# Altium PCB MainBoardPCB1.PcbDoc (part 14 of 40)
Units mm, origin at the board's own origin, x right, y up, seen from the top; angles counter-clockwise.
Board outline 258.95 x 308.86 mm, 16 copper layers (L1, L2 (GND), L3 (Sign), L4 (GND), L5 (Sign), L6 (PWR/GND), L7(PWR/GND), L8 (Plane_GND), L9 (PWR/GND), L10 (PWR/GND), L11 (PWR/GND), L12 (Sign), L13 (GND), L14 (Sign), L15 (GND), L16), stack 2.502 mm thick; 2397 components, 1744 nets, 8397 pads, 4112 vias.
Unrouted connection lines stored in the file: 3547.
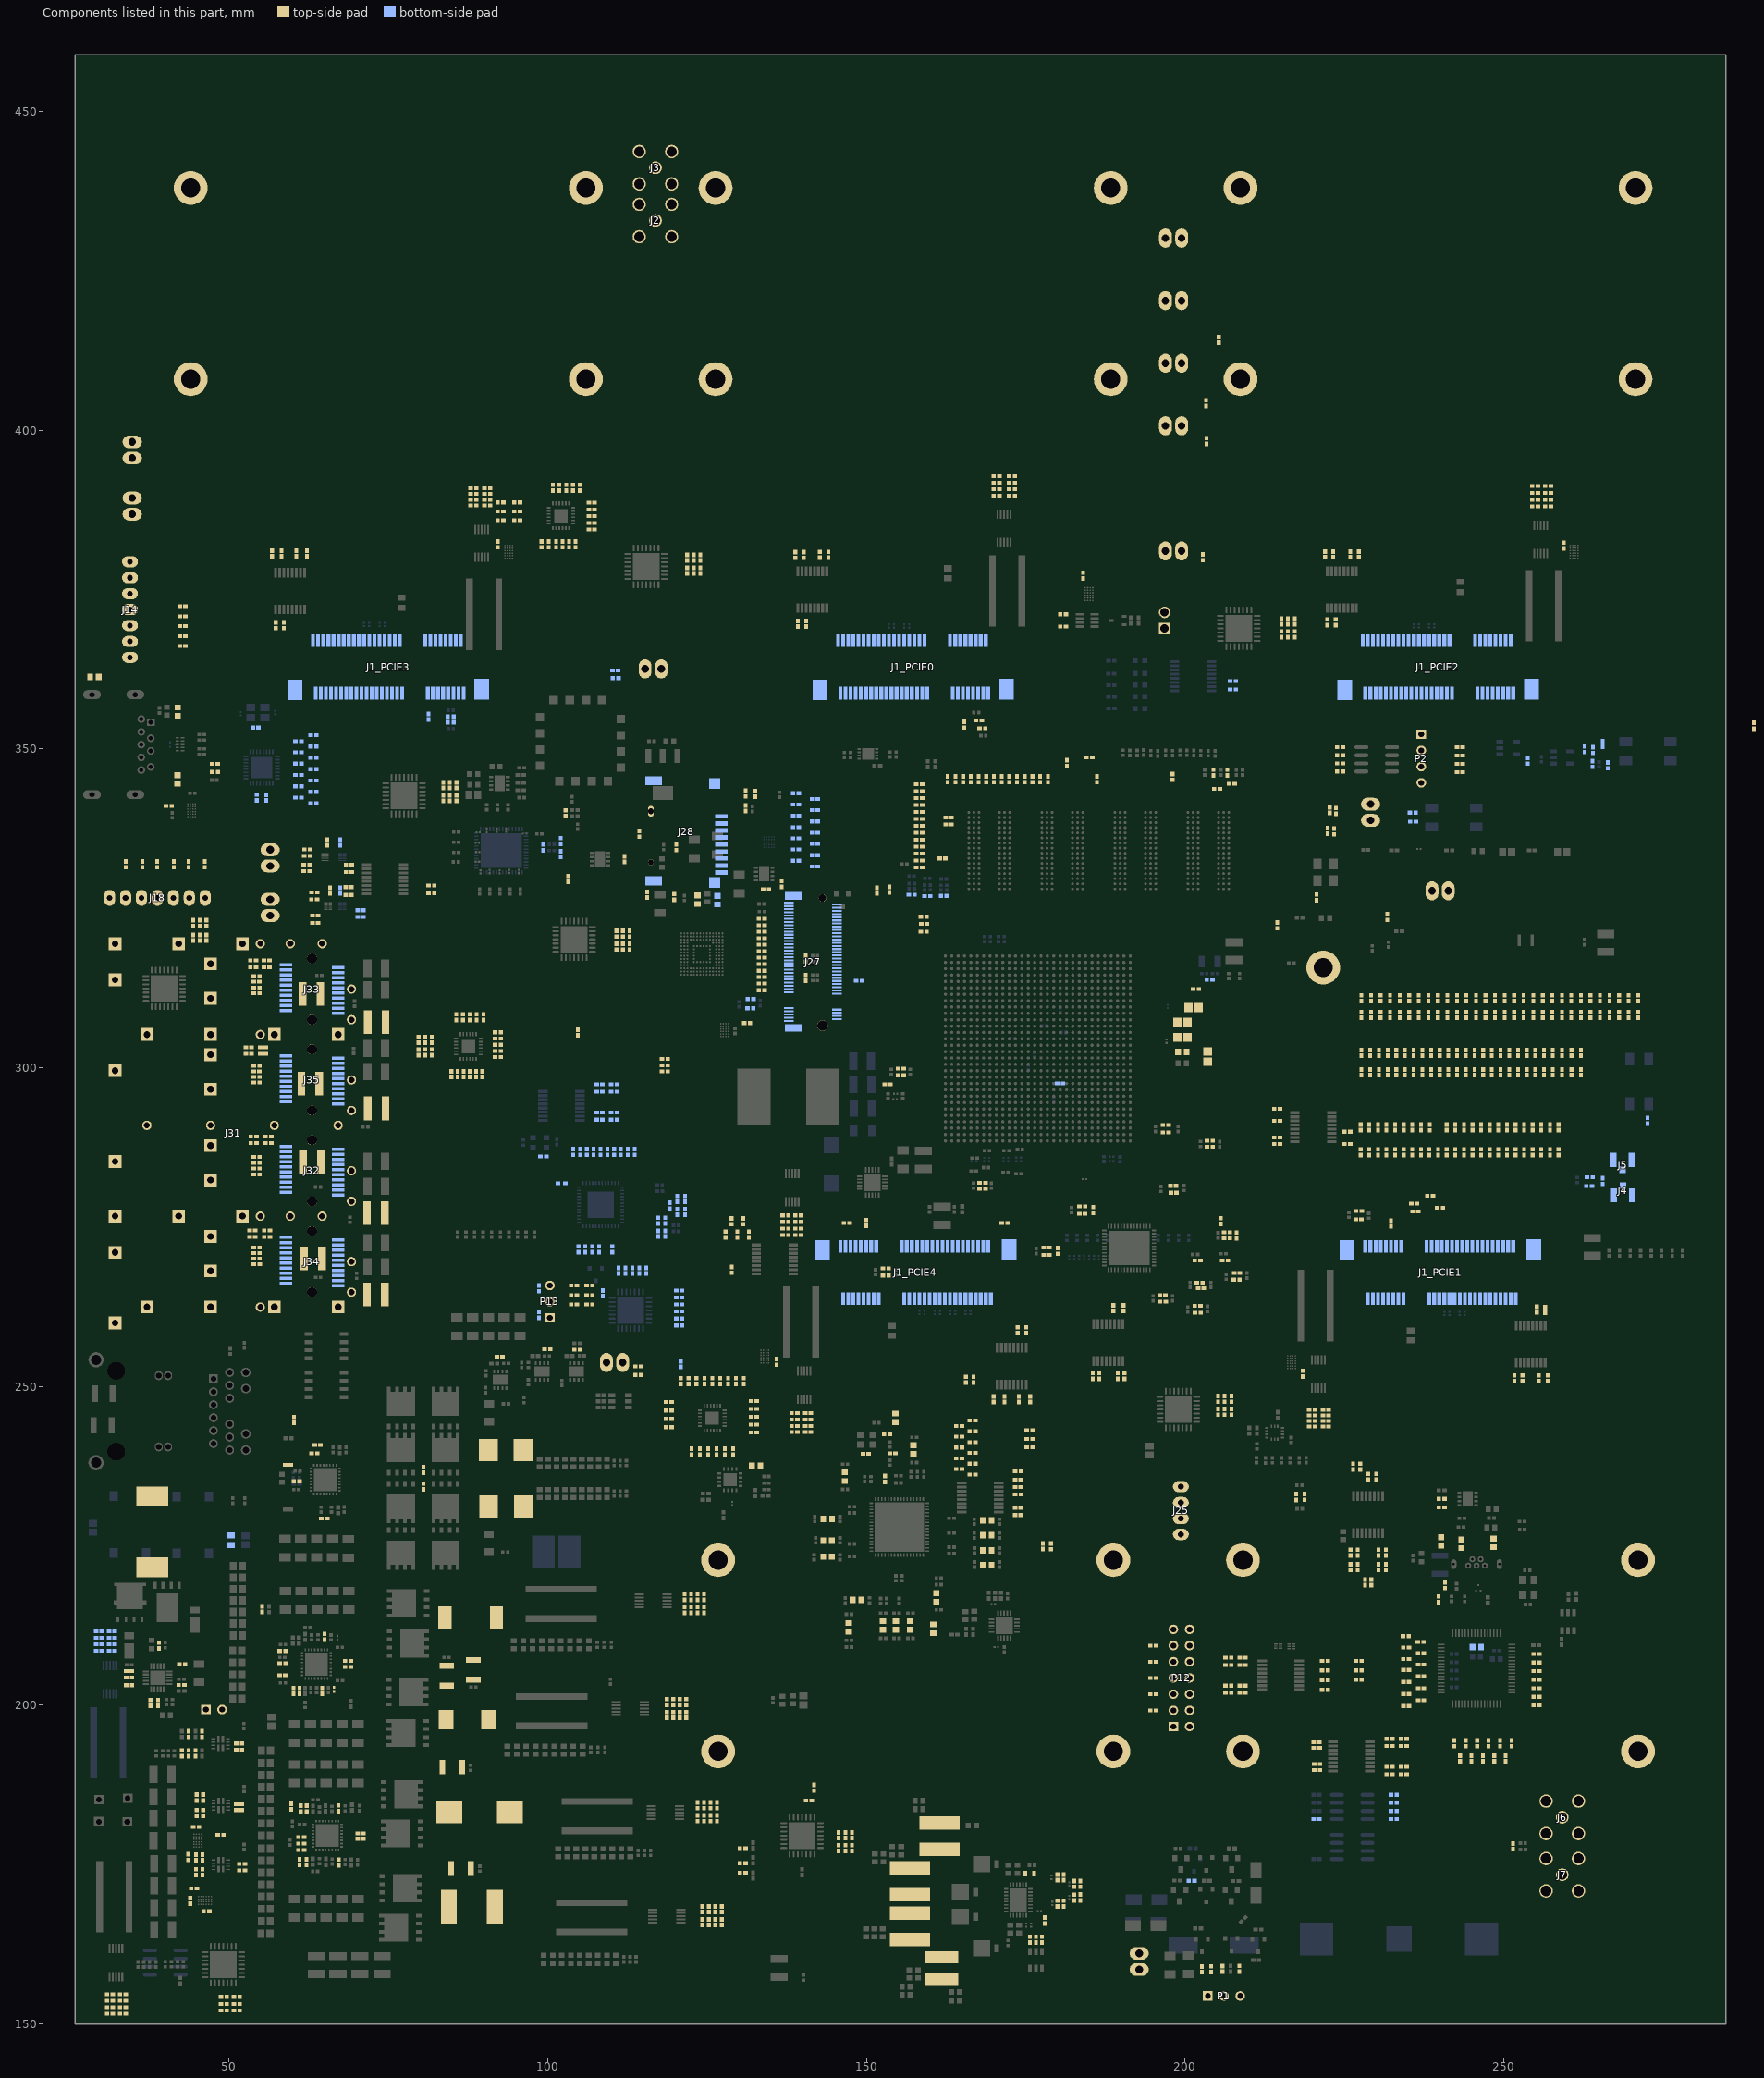
[diagram p20: the components of this part, seen from the top]

## Part data (continued)
R56: library part Resistor, "Resistor;  Thick Film;  Res 499 Ohms;  Pwr-Rtg 0.1 W;  Tol 1%;  SMT;  0402;  Tape & Reel", Case/Package=0402, Case Code (Metric)=1005, Manufacturer=Panasonic, Manufacturer Part Number=ERJ-2RKF4990X, Max Operating Temperature=155°C, Max Power Dissipation=100mW, Min Operating Temperature=-55°C, Package Quantity=1, Supplier Part Number 1=P499LCT-ND, Temperature Coefficient=100ppm/°C, Tolerance=1%, Voltage Rating=50V, Case Code (Imperial)=0402, Category="Chip SMD Resistors", ComponentLink1Description=https://datasheet.ciiva.com/9181/aoa0000ce2-9181461.pdf?src-supplier=Avnet, ComponentLink1URL=https://datasheet.ciiva.com/9181/aoa0000ce2-9181461.pdf?src-supplier=Avnet, ComponentLink2Description=https://datasheet.ciiva.com/28695/1678782-28695781.pdf?src-supplier=Element14, ComponentLink2URL=https://datasheet.ciiva.com/28695/1678782-28695781.pdf?src-supplier=Element14, ComponentLink3Description=https://datasheet.ciiva.com/6201/426256-6201373.pdf?src-supplier=Farnell, ComponentLink3URL=https://datasheet.ciiva.com/6201/426256-6201373.pdf?src-supplier=Farnell, ComponentLink4Description=https://datasheet.ciiva.com/16508/aoa0000ce2-16508382.pdf?src-supplier=Future+Electronics, ComponentLink4URL=https://datasheet.ciiva.com/16508/aoa0000ce2-16508382.pdf?src-supplier=Future+Electronics, ComponentLink5Description=https://datasheet.ciiva.com/16765/70260748-16765054.pdf?src-supplier=Allied+Electronics, ComponentLink5URL=https://datasheet.ciiva.com/16765/70260748-16765054.pdf?src-supplier=Allied+Electronics, ComponentLink6Description=https://datasheet.ciiva.com/22749/1678782-22749610.pdf?src-supplier=Element14, ComponentLink6URL=https://datasheet.ciiva.com/22749/1678782-22749610.pdf?src-supplier=Element14, ComponentLink7Description=https://datasheet.ciiva.com/46377/426256-46377550.pdf?src-supplier=Element14, ComponentLink7URL=https://datasheet.ciiva.com/46377/426256-46377550.pdf?src-supplier=Element14, Composition="Thick Film", Contact Plating=Tin, Depth=0.5mm, Features="Automotive AEC-Q200", Height=0.35mm, Lead Free="Lead Free", Length=1mm, Military Standard=Not, Mount="Surface Mount", Number of Terminations=2, Packaging="Tape and Reel", Power Rating=100mW, Pricing 1="1=0,10000, 10=0,04100, 100=0,01670, 1000=0,00751, 2500=0,00652, 5000=0,00538 (USD)", REACH SVHC="No SVHC", Resistance=499R, RoHS=Yes, Stock 1=4560116, Supplier 1=Digi-Key, Termination=SMD/SMT, Voltage Rating (DC)=50V, Width=0.02inch
R58 R99 R267 R276 R363 R364 R365 R381 R382 R730 R731 R732 R733 R734: library part Resistor, Case/Package=0402, Case Code (Metric)=1005, Manufacturer=Panasonic, Manufacturer Part Number=ERJ-2RKF4701X, Max Operating Temperature=155°C, Max Power Dissipation=100mW, Min Operating Temperature=-55°C, Package Quantity=1, Supplier Part Number 1=P4.70KLCT-ND, Temperature Coefficient=100ppm/°C, Tolerance=1%, Voltage Rating=50V, Case Code (Imperial)=0402, ComponentLink1Description=https://datasheet.ciiva.com/11821/0900766b80f80784-11821329.pdf?src-supplier=RSComponents, ComponentLink1URL=https://datasheet.ciiva.com/11821/0900766b80f80784-11821329.pdf?src-supplier=RSComponents, ComponentLink2Description=https://datasheet.ciiva.com/30053/aoa0000ce2-30053990.pdf?src-supplier=Onlinecomponents.com, ComponentLink2URL=https://datasheet.ciiva.com/30053/aoa0000ce2-30053990.pdf?src-supplier=Onlinecomponents.com, ComponentLink3Description=https://datasheet.ciiva.com/7830/aoa0000ce2-7830727.pdf?src-supplier=Element14, ComponentLink3URL=https://datasheet.ciiva.com/7830/aoa0000ce2-7830727.pdf?src-supplier=Element14, ComponentLink4Description=https://datasheet.ciiva.com/22781/1678782-22781576.pdf?src-supplier=Farnell, ComponentLink4URL=https://datasheet.ciiva.com/22781/1678782-22781576.pdf?src-supplier=Farnell, ComponentLink5Description=https://datasheet.ciiva.com/9195/aoa0000ce2-9195737.pdf?src-supplier=Avnet, ComponentLink5URL=https://datasheet.ciiva.com/9195/aoa0000ce2-9195737.pdf?src-supplier=Avnet, ComponentLink6Description=https://datasheet.ciiva.com/17213/aoa0000ce2-17213180.pdf?src-supplier=Avnet+Europe, ComponentLink6URL=https://datasheet.ciiva.com/17213/aoa0000ce2-17213180.pdf?src-supplier=Avnet+Europe, ComponentLink7Description=https://datasheet.ciiva.com/22667/1678782-22667886.pdf?src-supplier=Element14, ComponentLink7URL=https://datasheet.ciiva.com/22667/1678782-22667886.pdf?src-supplier=Element14, ComponentLink8Description=https://datasheet.ciiva.com/16763/70260748-16763151.pdf?src-supplier=Allied+Electronics, ComponentLink8URL=https://datasheet.ciiva.com/16763/70260748-16763151.pdf?src-supplier=Allied+Electronics, ComponentLink9Description=https://datasheet.ciiva.com/22723/1678782-22723903.pdf?src-supplier=Element14, ComponentLink9URL=https://datasheet.ciiva.com/22723/1678782-22723903.pdf?src-supplier=Element14, ComponentLink10Description=https://datasheet.ciiva.com/24025/aoa0000ce2-24025663.pdf?src-supplier=Mouser, ComponentLink10URL=https://datasheet.ciiva.com/24025/aoa0000ce2-24025663.pdf?src-supplier=Mouser, Composition="Thick Film", Contact Plating=Tin, Depth=0.5mm, Features="Automotive AEC-Q200", Height=0.35mm, Lead Free="Lead Free", Length=1mm, Military Standard=Not, Mount="Surface Mount", Number of Pins=2, Number of Terminations=2, Packaging="Tape and Reel", Power Rating=100mW, Pricing 1="1 = 0,10000, 10 = 0,05500, 100 = 0,02250, 1000 = 0,01009, 2500 = 0,00876, 5000 = 0,00724 (USD)", Radiation Hardening=No, REACH SVHC="No SVHC", Resistance=4.7kR, RoHS=Yes, Stock 1=5361977, Supplier 1=Digi-Key, Termination=SMD/SMT, Voltage Rating (DC)=50V, Width=0.02inch
R61 R62 R63 R64 R920: library part Resistor, Case/Package=0402, Case Code (Metric)=1005, Manufacturer=Vishay, Manufacturer Part Number=CRCW0402240RFKED, Max Operating Temperature=155°C, Max Power Dissipation=63mW, Min Operating Temperature=-55°C, Package Quantity=10, Supplier Part Number 1=541-240LCT-ND, Temperature Coefficient=100ppm/°C, Tolerance=1%, Voltage Rating=50V, Case Code (Imperial)=0402, ComponentLink1Description=https://datasheet.ciiva.com/11809/0900766b80d98824-11809853.pdf?src-supplier=RSComponents, ComponentLink1URL=https://datasheet.ciiva.com/11809/0900766b80d98824-11809853.pdf?src-supplier=RSComponents, ComponentLink2Description=https://datasheet.ciiva.com/16784/70201119-16784686.pdf?src-supplier=Allied+Electronics, ComponentLink2URL=https://datasheet.ciiva.com/16784/70201119-16784686.pdf?src-supplier=Allied+Electronics, ComponentLink3Description=https://datasheet.ciiva.com/16886/dcrcwe3-16886728.pdf?src-supplier=Avnet+Europe, ComponentLink3URL=https://datasheet.ciiva.com/16886/dcrcwe3-16886728.pdf?src-supplier=Avnet+Europe, ComponentLink4Description=https://datasheet.ciiva.com/2463/dcrcwe3-2463067.pdf?src-supplier=Digi-Key, ComponentLink4URL=https://datasheet.ciiva.com/2463/dcrcwe3-2463067.pdf?src-supplier=Digi-Key, ComponentLink5Description=https://datasheet.ciiva.com/2463/dcrcwe3-2463068.pdf?src-supplier=Digi-Key, ComponentLink5URL=https://datasheet.ciiva.com/2463/dcrcwe3-2463068.pdf?src-supplier=Digi-Key, ComponentLink6Description=https://datasheet.ciiva.com/2463/dcrcwe3-2463069.pdf?src-supplier=Digi-Key, ComponentLink6URL=https://datasheet.ciiva.com/2463/dcrcwe3-2463069.pdf?src-supplier=Digi-Key, ComponentLink7Description=https://datasheet.ciiva.com/8954/dcrcwe3-8954621.pdf?src-supplier=Avnet, ComponentLink7URL=https://datasheet.ciiva.com/8954/dcrcwe3-8954621.pdf?src-supplier=Avnet, ComponentLink8Description=https://datasheet.ciiva.com/16204/dcrcwe3-16204941.pdf?src-supplier=Future+Electronics, ComponentLink8URL=https://datasheet.ciiva.com/16204/dcrcwe3-16204941.pdf?src-supplier=Future+Electronics, ComponentLink9Description=https://datasheet.ciiva.com/5546/dcrcwe3-109170-5546510.pdf?src-supplier=Mouser, ComponentLink9URL=https://datasheet.ciiva.com/5546/dcrcwe3-109170-5546510.pdf?src-supplier=Mouser, ComponentLink10Description=https://datasheet.ciiva.com/16780/70201119-16780206.pdf?src-supplier=Allied+Electronics, ComponentLink10URL=https://datasheet.ciiva.com/16780/70201119-16780206.pdf?src-supplier=Allied+Electronics, Composition="Thick Film", Contact Plating=Tin, Depth=0.5mm, Features="Automotive AEC-Q200", Height=0.35mm, Lead Free="Lead Free", Length=1mm, Military Standard=Not, Mount="Surface Mount", Number of Terminations=2, Packaging="Tape and Reel", Power Rating=63mW, Pricing 1="1 = 0,10000, 10 = 0,03800, 100 = 0,01540, 1000 = 0,00690, 2500 = 0,00599, 5000 = 0,00495 (USD)", Radiation Hardening=No, REACH SVHC=Unknown, Resistance=240R, RoHS=Yes, Stock 1=21562, Supplier 1=Digi-Key, Termination=SMD/SMT, Voltage Rating (DC)=50V, Weight=2.3E-05oz, Width=0.02inch, Working Voltage=50V
R65 R66 R67 R68 R83 R84 R85 R86 R97 R98 R123 R135 R136 R137 R138 R145 R146 R147 R148 R155 R156 R157 R158 R346 R347 R348 R349 R350 R351 R352 R353 R354 R355 R356 R357 R367: library part Resistor, Case Code (Imperial)=0402, Case Code (Metric)=1005, Manufacturer=Panasonic, Manufacturer Part Number=ERJ-2RKF4701X, Max Operating Temperature=155°C, Max Power Dissipation=100mW, Min Operating Temperature=-55°C, Package Quantity=1, Supplier Part Number 1=P4.70KLCT-ND, Temperature Coefficient=100ppm/°C, Tolerance=1%, Voltage Rating=50V, Case/Package=0402, ComponentLink1Description=https://datasheet.ciiva.com/11821/0900766b80f80784-11821329.pdf?src-supplier=RSComponents, ComponentLink1URL=https://datasheet.ciiva.com/11821/0900766b80f80784-11821329.pdf?src-supplier=RSComponents, ComponentLink2Description=https://datasheet.ciiva.com/30053/aoa0000ce2-30053990.pdf?src-supplier=Onlinecomponents.com, ComponentLink2URL=https://datasheet.ciiva.com/30053/aoa0000ce2-30053990.pdf?src-supplier=Onlinecomponents.com, ComponentLink3Description=https://datasheet.ciiva.com/7830/aoa0000ce2-7830727.pdf?src-supplier=Element14, ComponentLink3URL=https://datasheet.ciiva.com/7830/aoa0000ce2-7830727.pdf?src-supplier=Element14, ComponentLink4Description=https://datasheet.ciiva.com/22781/1678782-22781576.pdf?src-supplier=Farnell, ComponentLink4URL=https://datasheet.ciiva.com/22781/1678782-22781576.pdf?src-supplier=Farnell, ComponentLink5Description=https://datasheet.ciiva.com/9195/aoa0000ce2-9195737.pdf?src-supplier=Avnet, ComponentLink5URL=https://datasheet.ciiva.com/9195/aoa0000ce2-9195737.pdf?src-supplier=Avnet, ComponentLink6Description=https://datasheet.ciiva.com/17213/aoa0000ce2-17213180.pdf?src-supplier=Avnet+Europe, ComponentLink6URL=https://datasheet.ciiva.com/17213/aoa0000ce2-17213180.pdf?src-supplier=Avnet+Europe, ComponentLink7Description=https://datasheet.ciiva.com/22667/1678782-22667886.pdf?src-supplier=Element14, ComponentLink7URL=https://datasheet.ciiva.com/22667/1678782-22667886.pdf?src-supplier=Element14, ComponentLink8Description=https://datasheet.ciiva.com/16763/70260748-16763151.pdf?src-supplier=Allied+Electronics, ComponentLink8URL=https://datasheet.ciiva.com/16763/70260748-16763151.pdf?src-supplier=Allied+Electronics, ComponentLink9Description=https://datasheet.ciiva.com/22723/1678782-22723903.pdf?src-supplier=Element14, ComponentLink9URL=https://datasheet.ciiva.com/22723/1678782-22723903.pdf?src-supplier=Element14, ComponentLink10Description=https://datasheet.ciiva.com/24025/aoa0000ce2-24025663.pdf?src-supplier=Mouser, ComponentLink10URL=https://datasheet.ciiva.com/24025/aoa0000ce2-24025663.pdf?src-supplier=Mouser, Composition="Thick Film", Contact Plating=Tin, Depth=0.5mm, Features="Automotive AEC-Q200", Height=0.35mm, Lead Free="Lead Free", Length=1mm, Military Standard=Not, Mount="Surface Mount", Number of Pins=2, Number of Terminations=2, Packaging="Tape and Reel", Power Rating=100mW, Pricing 1="1 = 0,10000, 10 = 0,05500, 100 = 0,02250, 1000 = 0,01009, 2500 = 0,00876, 5000 = 0,00724 (USD)", Radiation Hardening=No, REACH SVHC="No SVHC", Resistance=4.7kR, RoHS=Yes, Stock 1=5361977, Supplier 1=Digi-Key, Termination=SMD/SMT, Voltage Rating (DC)=50V, Width=0.02inch
R69 R70 R78 R82 R126 R311 R535 R543 R654 R657: library part Resistor, Case Code (Imperial)=0402, Case Code (Metric)=1005, Manufacturer="Vishay Dale", Manufacturer Part Number=CRCW0402100RFKED, Max Operating Temperature=155°C, Max Power Dissipation=63mW, Min Operating Temperature=-55°C, Package Quantity=10, Supplier Part Number 1=541-100LDKR-ND, Temperature Coefficient=100ppm/°C, Tolerance=1%, Voltage Rating=50V, Case/Package=0402, ComponentLink1Description=https://datasheet.ciiva.com/11809/0900766b80d98824-11809081.pdf?src-supplier=RSComponents, ComponentLink1URL=https://datasheet.ciiva.com/11809/0900766b80d98824-11809081.pdf?src-supplier=RSComponents, ComponentLink2Description=https://datasheet.ciiva.com/2463/dcrcwe3-2463094.pdf?src-supplier=Digi-Key, ComponentLink2URL=https://datasheet.ciiva.com/2463/dcrcwe3-2463094.pdf?src-supplier=Digi-Key, ComponentLink3Description=https://datasheet.ciiva.com/16199/dcrcwe3-16199158.pdf?src-supplier=Future+Electronics, ComponentLink3URL=https://datasheet.ciiva.com/16199/dcrcwe3-16199158.pdf?src-supplier=Future+Electronics, ComponentLink4Description=https://datasheet.ciiva.com/2463/dcrcwe3-2463095.pdf?src-supplier=Digi-Key, ComponentLink4URL=https://datasheet.ciiva.com/2463/dcrcwe3-2463095.pdf?src-supplier=Digi-Key, ComponentLink5Description=https://datasheet.ciiva.com/2463/dcrcwe3-2463096.pdf?src-supplier=Digi-Key, ComponentLink5URL=https://datasheet.ciiva.com/2463/dcrcwe3-2463096.pdf?src-supplier=Digi-Key, ComponentLink6Description=https://datasheet.ciiva.com/5552/dcrcwe3-109170-5552168.pdf?src-supplier=Mouser, ComponentLink6URL=https://datasheet.ciiva.com/5552/dcrcwe3-109170-5552168.pdf?src-supplier=Mouser, ComponentLink7Description=https://datasheet.ciiva.com/8083/dcrcwe3-8083977.pdf?src-supplier=Avnet, ComponentLink7URL=https://datasheet.ciiva.com/8083/dcrcwe3-8083977.pdf?src-supplier=Avnet, ComponentLink8Description=https://datasheet.ciiva.com/16722/70201119-16722524.pdf?src-supplier=Allied+Electronics, ComponentLink8URL=https://datasheet.ciiva.com/16722/70201119-16722524.pdf?src-supplier=Allied+Electronics, ComponentLink9Description=https://datasheet.ciiva.com/22673/1697337-22673117.pdf?src-supplier=Element14, ComponentLink9URL=https://datasheet.ciiva.com/22673/1697337-22673117.pdf?src-supplier=Element14, ComponentLink10Description=https://datasheet.ciiva.com/22673/1697337-22673118.pdf?src-supplier=Element14, ComponentLink10URL=https://datasheet.ciiva.com/22673/1697337-22673118.pdf?src-supplier=Element14, ComponentLink11Description=https://datasheet.ciiva.com/3255/dcrcwe3-3255951.pdf?src-supplier=Avnet, ComponentLink11URL=https://datasheet.ciiva.com/3255/dcrcwe3-3255951.pdf?src-supplier=Avnet, Composition="Thick Film", Contact Plating=Tin, Depth=0.5mm, Features="Automotive AEC-Q200", Height=0.35mm, Lead Free="Lead Free", Length=1mm, Military Standard=Not, Mount="Surface Mount", Number of Terminations=2, Packaging="Tape and Reel", Power Rating=63mW, Pricing 1="1 = 0,10000, 10 = 0,03600, 100 = 0,01460, 1000 = 0,00657, 2500 = 0,00570, 5000 = 0,00471 (USD)", Radiation Hardening=No, REACH SVHC=Unknown, Resistance=100R, RoHS=Yes, Stock 1=93648, Supplier 1=Digi-Key, Termination=SMD/SMT, Voltage Rating (DC)=50V, Weight=2.3E-05oz, Width=0.02inch, Working Voltage=50V
R76 R79: library part Resistor, "RES SMD 150 OHM 1% 1/10W 0402", Case/Package=0402, Case Code (Metric)=1005, Manufacturer=Panasonic, Manufacturer Part Number=ERJ-2RKF1500X, Max Operating Temperature=155°C, Max Power Dissipation=100mW, Min Operating Temperature=-55°C, Package Quantity=1, Supplier Part Number 1=P150LCT-ND, Temperature Coefficient=100ppm/°C, Tolerance=1%, Voltage Rating=50V, Case Code (Imperial)=0402, Category="Chip SMD Resistors", ComponentLink1Description=https://datasheet.ciiva.com/34303/1987126-34303555.pdf?src-supplier=Jameco, ComponentLink1URL=https://datasheet.ciiva.com/34303/1987126-34303555.pdf?src-supplier=Jameco, ComponentLink2Description=https://datasheet.ciiva.com/11821/0900766b80f80784-11821183.pdf?src-supplier=RSComponents, ComponentLink2URL=https://datasheet.ciiva.com/11821/0900766b80f80784-11821183.pdf?src-supplier=RSComponents, ComponentLink3Description=https://datasheet.ciiva.com/16774/70260748-16774549.pdf?src-supplier=Allied+Electronics, ComponentLink3URL=https://datasheet.ciiva.com/16774/70260748-16774549.pdf?src-supplier=Allied+Electronics, ComponentLink4Description=https://datasheet.ciiva.com/43467/1678782-43467237.pdf?src-supplier=Farnell, ComponentLink4URL=https://datasheet.ciiva.com/43467/1678782-43467237.pdf?src-supplier=Farnell, ComponentLink5Description=https://datasheet.ciiva.com/7887/426256-7887016.pdf?src-supplier=Element14, ComponentLink5URL=https://datasheet.ciiva.com/7887/426256-7887016.pdf?src-supplier=Element14, ComponentLink6Description=https://datasheet.ciiva.com/16371/aoa0000ce2-16371497.pdf?src-supplier=Future+Electronics, ComponentLink6URL=https://datasheet.ciiva.com/16371/aoa0000ce2-16371497.pdf?src-supplier=Future+Electronics, ComponentLink7Description=https://datasheet.ciiva.com/7886/aoa0000ce2-7886714.pdf?src-supplier=Element14, ComponentLink7URL=https://datasheet.ciiva.com/7886/aoa0000ce2-7886714.pdf?src-supplier=Element14, ComponentLink8Description=https://datasheet.ciiva.com/46373/1678782-46373162.pdf?src-supplier=Element14, ComponentLink8URL=https://datasheet.ciiva.com/46373/1678782-46373162.pdf?src-supplier=Element14, ComponentLink9Description=https://datasheet.ciiva.com/46373/1678782-46373163.pdf?src-supplier=Element14, ComponentLink9URL=https://datasheet.ciiva.com/46373/1678782-46373163.pdf?src-supplier=Element14, ComponentLink10Description=https://datasheet.ciiva.com/16770/70260748-16770572.pdf?src-supplier=Allied+Electronics, ComponentLink10URL=https://datasheet.ciiva.com/16770/70260748-16770572.pdf?src-supplier=Allied+Electronics, ComponentLink11Description=https://datasheet.ciiva.com/17207/aoa0000ce2-17207389.pdf?src-supplier=Avnet+Europe, ComponentLink11URL=https://datasheet.ciiva.com/17207/aoa0000ce2-17207389.pdf?src-supplier=Avnet+Europe, ComponentLink12Description=https://datasheet.ciiva.com/28568/1678782-28568846.pdf?src-supplier=Element14, ComponentLink12URL=https://datasheet.ciiva.com/28568/1678782-28568846.pdf?src-supplier=Element14, ComponentLink13Description=https://datasheet.ciiva.com/30106/aoa0000ce2-30106926.pdf?src-supplier=Onlinecomponents.com, ComponentLink13URL=https://datasheet.ciiva.com/30106/aoa0000ce2-30106926.pdf?src-supplier=Onlinecomponents.com, ComponentLink14Description=https://datasheet.ciiva.com/22673/1678782-22673679.pdf?src-supplier=Element14, ComponentLink14URL=https://datasheet.ciiva.com/22673/1678782-22673679.pdf?src-supplier=Element14, Composition="Thick Film", Contact Plating=Tin, Depth=0.5mm, Features="Automotive AEC-Q200", Height=0.35mm, Lead Free="Lead Free", Length=1mm, Military Standard=Not, Mount="Surface Mount", Number of Pins=2, Number of Terminations=2, Packaging="Tape and Reel", Power Rating=100mW, Pricing 1="1=0,10000, 10=0,04100, 100=0,01670, 1000=0,00751, 2500=0,00652, 5000=0,00538 (USD)", Radiation Hardening=No, REACH SVHC="No SVHC", Resistance=150R, RoHS=Yes, Stock 1=1074892, Supplier 1=Digi-Key, Termination=SMD/SMT, Voltage Rating (DC)=50V, Width=0.02inch
R77: library part Resistor, "RES SMD 7.5K OHM 0.5% 1/16W 0402", Case Code (Imperial)=0402, Case Code (Metric)=1005, Manufacturer=Susumu, Manufacturer Part Number=RR0510P-752-D, Max Operating Temperature=125°C, Max Power Dissipation=63mW, Min Operating Temperature=-55°C, Package Quantity=1, Power Rating=62.5mW, Supplier Part Number 1=RR05P7.5KDCT-ND, Temperature Coefficient=25ppm/°C, Tolerance=0.5%, Voltage Rating=25V, Voltage Rating (DC)=50V, Case/Package=0402, Category="Chip SMD Resistors", ComponentLink1Description=https://datasheet.ciiva.com/2525/rr-data-sheet-2525152.pdf?src-supplier=Digi-Key, ComponentLink1URL=https://datasheet.ciiva.com/2525/rr-data-sheet-2525152.pdf?src-supplier=Digi-Key, ComponentLink2Description=https://datasheet.ciiva.com/2525/rr-data-sheet-2525153.pdf?src-supplier=Digi-Key, ComponentLink2URL=https://datasheet.ciiva.com/2525/rr-data-sheet-2525153.pdf?src-supplier=Digi-Key, ComponentLink3Description=https://datasheet.ciiva.com/2525/rr-data-sheet-2525154.pdf?src-supplier=Digi-Key, ComponentLink3URL=https://datasheet.ciiva.com/2525/rr-data-sheet-2525154.pdf?src-supplier=Digi-Key, Composition="Thin Film", Height=0.016inch, Lead Free="Lead Free", Length=0.039inch, Number of Terminations=2, Packaging="Tape and Reel", Pricing 1="1=0,10000, 10=0,07400, 100=0,02850, 1000=0,01254, 2500=0,01083, 5000=0,00969 (USD)", Resistance=7.5kR, RoHS=Yes, Stock 1=33319, Supplier 1=Digi-Key, Termination=SMD/SMT, Width=0.02inch
R80 R534: library part Resistor, "Res Thick Film 0402 160 Ohm 1% 1/16W 100ppm/C Molded SMD SMD Paper T/R", Case/Package=0402, Manufacturer="Stackpole Electronics", Manufacturer Part Number=RMCF0402FT160R, Max Operating Temperature=155°C, Min Operating Temperature=-55°C, Supplier Part Number 1=RMCF0402FT160RCT-ND, Temperature Coefficient=100ppm/°C, Tolerance=1%, Category="Chip SMD Resistors", ComponentLink1Description=https://www.seielect.com/catalog/SEI-RMCF_RMCP.pdf?src-supplier=Avnet, ComponentLink1URL=https://www.seielect.com/catalog/SEI-RMCF_RMCP.pdf?src-supplier=Avnet, Composition="Thick Film", Contact Plating=Tin,Matte, Mount="Surface Mount", Packaging="Tape and Reel", Pricing 1="1=0,10000, 10=0,01400, 100=0,00580, 1000=0,00262, 2500=0,00228, 5000=0,00188 (USD)", Radiation Hardening=No, Resistance=160R, RoHS=Yes, Stock 1=34661, Supplier 1=Digi-Key
R81 R245 R270 R305 R308 R309 R489 R536 R541 R542: library part Resistor, Case/Package=0402, Case Code (Metric)=1005, Manufacturer="Vishay Dale", Manufacturer Part Number=CRCW0402100RFKED, Max Operating Temperature=155°C, Max Power Dissipation=63mW, Min Operating Temperature=-55°C, Package Quantity=10, Supplier Part Number 1=541-100LDKR-ND, Temperature Coefficient=100ppm/°C, Tolerance=1%, Voltage Rating=50V, Case Code (Imperial)=0402, ComponentLink1Description=https://datasheet.ciiva.com/11809/0900766b80d98824-11809081.pdf?src-supplier=RSComponents, ComponentLink1URL=https://datasheet.ciiva.com/11809/0900766b80d98824-11809081.pdf?src-supplier=RSComponents, ComponentLink2Description=https://datasheet.ciiva.com/2463/dcrcwe3-2463094.pdf?src-supplier=Digi-Key, ComponentLink2URL=https://datasheet.ciiva.com/2463/dcrcwe3-2463094.pdf?src-supplier=Digi-Key, ComponentLink3Description=https://datasheet.ciiva.com/16199/dcrcwe3-16199158.pdf?src-supplier=Future+Electronics, ComponentLink3URL=https://datasheet.ciiva.com/16199/dcrcwe3-16199158.pdf?src-supplier=Future+Electronics, ComponentLink4Description=https://datasheet.ciiva.com/2463/dcrcwe3-2463095.pdf?src-supplier=Digi-Key, ComponentLink4URL=https://datasheet.ciiva.com/2463/dcrcwe3-2463095.pdf?src-supplier=Digi-Key, ComponentLink5Description=https://datasheet.ciiva.com/2463/dcrcwe3-2463096.pdf?src-supplier=Digi-Key, ComponentLink5URL=https://datasheet.ciiva.com/2463/dcrcwe3-2463096.pdf?src-supplier=Digi-Key, ComponentLink6Description=https://datasheet.ciiva.com/5552/dcrcwe3-109170-5552168.pdf?src-supplier=Mouser, ComponentLink6URL=https://datasheet.ciiva.com/5552/dcrcwe3-109170-5552168.pdf?src-supplier=Mouser, ComponentLink7Description=https://datasheet.ciiva.com/8083/dcrcwe3-8083977.pdf?src-supplier=Avnet, ComponentLink7URL=https://datasheet.ciiva.com/8083/dcrcwe3-8083977.pdf?src-supplier=Avnet, ComponentLink8Description=https://datasheet.ciiva.com/16722/70201119-16722524.pdf?src-supplier=Allied+Electronics, ComponentLink8URL=https://datasheet.ciiva.com/16722/70201119-16722524.pdf?src-supplier=Allied+Electronics, ComponentLink9Description=https://datasheet.ciiva.com/22673/1697337-22673117.pdf?src-supplier=Element14, ComponentLink9URL=https://datasheet.ciiva.com/22673/1697337-22673117.pdf?src-supplier=Element14, ComponentLink10Description=https://datasheet.ciiva.com/22673/1697337-22673118.pdf?src-supplier=Element14, ComponentLink10URL=https://datasheet.ciiva.com/22673/1697337-22673118.pdf?src-supplier=Element14, ComponentLink11Description=https://datasheet.ciiva.com/3255/dcrcwe3-3255951.pdf?src-supplier=Avnet, ComponentLink11URL=https://datasheet.ciiva.com/3255/dcrcwe3-3255951.pdf?src-supplier=Avnet, Composition="Thick Film", Contact Plating=Tin, Depth=0.5mm, Features="Automotive AEC-Q200", Height=0.35mm, Lead Free="Lead Free", Length=1mm, Military Standard=Not, Mount="Surface Mount", Number of Terminations=2, Packaging="Tape and Reel", Power Rating=63mW, Pricing 1="1 = 0,10000, 10 = 0,03600, 100 = 0,01460, 1000 = 0,00657, 2500 = 0,00570, 5000 = 0,00471 (USD)", Radiation Hardening=No, REACH SVHC=Unknown, Resistance=100R, RoHS=Yes, Stock 1=93648, Supplier 1=Digi-Key, Termination=SMD/SMT, Voltage Rating (DC)=50V, Weight=2.3E-05oz, Width=0.02inch, Working Voltage=50V
R87 R88 R89 R90 R95 R96 R101 R102 R103 R104 R105 R107 R108 R110 R111 R112 R115 R116 R117 R118 R119 R120 R121 R122: library part Resistor, "RES SMD 30 OHM 0.5% 1/16W 0402", Case Code (Imperial)=0402, Case Code (Metric)=1005, Manufacturer=Panasonic, Manufacturer Part Number=ERA-2AKD300X, Max Operating Temperature=155°C, Max Power Dissipation=63mW, Min Operating Temperature=-55°C, Package Quantity=10000, Power Rating=62.5mW, Supplier Part Number 1=P30DDCT-ND, Temperature Coefficient=100ppm/°C, Tolerance=0.5%, Case/Package=0402, Category="Chip SMD Resistors", ComponentLink1Description=https://media.digikey.com/pdf/Data%20Sheets/Panasonic%20Resistors%20Thermistors%20PDFs/ERA_Series_LE.pdf?src-supplier=Digi-Key, ComponentLink1URL=https://media.digikey.com/pdf/Data%20Sheets/Panasonic%20Resistors%20Thermistors%20PDFs/ERA_Series_LE.pdf?src-supplier=Digi-Key, ComponentLink2Description=http://www.mouser.com/ds/2/315/AOA0000CE26-32660.pdf?src-supplier=Mouser, ComponentLink2URL=http://www.mouser.com/ds/2/315/AOA0000CE26-32660.pdf?src-supplier=Mouser, ComponentLink3Description=http://industrial.panasonic.com/www-data/pdf/AOA0000/AOA0000CE26.pdf?src-supplier=Avnet, ComponentLink3URL=http://industrial.panasonic.com/www-data/pdf/AOA0000/AOA0000CE26.pdf?src-supplier=Avnet, ComponentLink4Description=https://industrial.panasonic.com/cdbs/www-data/pdf/RDM0000/AOA0000C307.pdf?src-supplier=Digi-Key, ComponentLink4URL=https://industrial.panasonic.com/cdbs/www-data/pdf/RDM0000/AOA0000C307.pdf?src-supplier=Digi-Key, Composition="Thin Film", Contact Plating=Tin, Height=0.016inch, Lead Free="Lead Free", Length=0.039inch, Mount="Surface Mount", Number of Terminations=2, Packaging="Tape and Reel", Pricing 1="1=0,10000, 10=0,07500, 100=0,03070, 1000=0,01377, 2500=0,01196, 5000=0,00988 (USD)", Resistance=30R, RoHS=Yes, Stock 1=32301, Supplier 1=Digi-Key, Width=0.02inch
R113: library part Resistor, "Thick Film Resistors 34.8K OHM 1%", Case Code (Imperial)=0402, Case Code (Metric)=1005, Manufacturer=Yageo, Manufacturer Part Number=RC0402FR-0734K8L, Max Operating Temperature=155°C, Max Power Dissipation=63mW, Min Operating Temperature=-55°C, Power Rating=62.5mW, Supplier Part Number 1=YAG3125CT-ND, Temperature Coefficient=100ppm/°C, Tolerance=1%, Voltage Rating=50V, Case/Package=0402, Category="Chip SMD Resistors", ComponentLink1Description=https://datasheet.ciiva.com/16857/pyu-rc0402-51-rohs-l-6-16857399.pdf?src-supplier=Avnet+Europe, ComponentLink1URL=https://datasheet.ciiva.com/16857/pyu-rc0402-51-rohs-l-6-16857399.pdf?src-supplier=Avnet+Europe, ComponentLink2Description=https://datasheet.ciiva.com/26830/getdatasheetpartid-323739-26830055.pdf?src-supplier=Verical, ComponentLink2URL=https://datasheet.ciiva.com/26830/getdatasheetpartid-323739-26830055.pdf?src-supplier=Verical, ComponentLink3Description=https://datasheet.ciiva.com/12656/pyu-rc0402-51-rohs-l-6-r-12656904.pdf?src-supplier=Mouser, ComponentLink3URL=https://datasheet.ciiva.com/12656/pyu-rc0402-51-rohs-l-6-r-12656904.pdf?src-supplier=Mouser, ComponentLink4Description=https://datasheet.ciiva.com/28400/pyu-rc0402-51-rohs-l-6-28400889.pdf?src-supplier=Avnet+Europe, ComponentLink4URL=https://datasheet.ciiva.com/28400/pyu-rc0402-51-rohs-l-6-28400889.pdf?src-supplier=Avnet+Europe, ComponentLink5Description=https://datasheet.ciiva.com/8889/pyu-rc0402-51-rohs-l-6-8889501.pdf?src-supplier=Avnet, ComponentLink5URL=https://datasheet.ciiva.com/8889/pyu-rc0402-51-rohs-l-6-8889501.pdf?src-supplier=Avnet, Composition="Thick Film", Contact Plating=Tin,Matte, Depth=0.5mm, Features="Moisture Resistant", Height=0.016inch, Lead Free="Lead Free", Length=1mm, Military Standard=Not, Number of Terminations=2, Packaging="Tape and Reel", Pricing 1="1=0,10000, 10=0,01600, 100=0,00640, 1000=0,00289, 2500=0,00251, 5000=0,00207 (USD)", Resistance=34.8kR, RoHS=Yes, Stock 1=121134, Supplier 1=Digi-Key, Termination=SMD/SMT, Voltage Rating (DC)=50V, Width=0.02inch
R114 R274 R515 R522 R523 R531 R546 R548 R549 R551 R552 R554 R555 R557: library part Resistor, Case Code (Imperial)=0402, Case Code (Metric)=1005, Manufacturer 1=Yageo, Manufacturer Part Number 1=RC0402FR-0710KL, Max Operating Temperature=155°C, Min Operating Temperature=-55°C, Power Rating=62.5mW, Supplier Part Number 1=311-10.0KLRCT-ND, Temperature Coefficient=100ppm/°C, Tolerance=1%, Voltage Rating=50V, Case/Package=0402, ComponentLink1Description=https://datasheet.ciiva.com/7660/38568-7660787.pdf?src-supplier=Element14, ComponentLink1URL=https://datasheet.ciiva.com/7660/38568-7660787.pdf?src-supplier=Element14, ComponentLink2Description=https://datasheet.ciiva.com/7849/1784430-7849813.pdf?src-supplier=Element14, ComponentLink2URL=https://datasheet.ciiva.com/7849/1784430-7849813.pdf?src-supplier=Element14, ComponentLink3Description=https://datasheet.ciiva.com/7849/1686128-7849814.pdf?src-supplier=Element14, ComponentLink3URL=https://datasheet.ciiva.com/7849/1686128-7849814.pdf?src-supplier=Element14, ComponentLink4Description=https://datasheet.ciiva.com/7849/1784430-7849815.pdf?src-supplier=Element14, ComponentLink4URL=https://datasheet.ciiva.com/7849/1784430-7849815.pdf?src-supplier=Element14, ComponentLink5Description=https://datasheet.ciiva.com/22747/1018594-22747512.pdf?src-supplier=Element14, ComponentLink5URL=https://datasheet.ciiva.com/22747/1018594-22747512.pdf?src-supplier=Element14, ComponentLink6Description=https://datasheet.ciiva.com/12667/pyu-rc0402-51-rohs-l-6-r-12667067.pdf?src-supplier=Mouser, ComponentLink6URL=https://datasheet.ciiva.com/12667/pyu-rc0402-51-rohs-l-6-r-12667067.pdf?src-supplier=Mouser, ComponentLink7Description=https://datasheet.ciiva.com/7983/1018594-7983486.pdf?src-supplier=Element14, ComponentLink7URL=https://datasheet.ciiva.com/7983/1018594-7983486.pdf?src-supplier=Element14, Composition="Thick Film", Depth=0.5mm, Height=0.32mm, Lead Free="Lead Free", Lead Pitch=0.2mm, Length=1mm, Military Standard=Not, Number of Pins=2, Number of Terminations=2, Packaging="Tape and Reel", Pricing 1="1=0,10000, 10=0,01500, 100=0,00600, 1000=0,00270, 2500=0,00235, 5000=0,00194 (USD)", REACH SVHC="No SVHC", Resistance=10kR, RoHS=Yes, Stock 1=71214322, Supplier 1=Digi-Key, Termination=SMD/SMT, Voltage Rating (DC)=50V, Width=0.5mm, Working Voltage=50V
R127 R128 R129 R366: library part Resistor, "SMT Resistor", Case/Package=0402, Case Code (Metric)=1005, Manufacturer=Panasonic, Manufacturer Part Number=ERJ-2RKF1002X, Max Operating Temperature=155°C, Max Power Dissipation=100mW, Min Operating Temperature=-55°C, Package Quantity=1, Supplier Part Number 1=P10.0KLCT-ND, Temperature Coefficient=100ppm/°C, Tolerance=1%, Voltage Rating=50V, Case Code (Imperial)=0402, ComponentLink1Description=https://datasheet.ciiva.com/11821/0900766b80f80784-11821171.pdf?src-supplier=RSComponents, ComponentLink1URL=https://datasheet.ciiva.com/11821/0900766b80f80784-11821171.pdf?src-supplier=RSComponents, ComponentLink2Description=https://datasheet.ciiva.com/16199/aoa0000ce2-16199478.pdf?src-supplier=Future+Electronics, ComponentLink2URL=https://datasheet.ciiva.com/16199/aoa0000ce2-16199478.pdf?src-supplier=Future+Electronics, ComponentLink3Description=https://datasheet.ciiva.com/17212/aoa0000ce2-17212102.pdf?src-supplier=Avnet+Europe, ComponentLink3URL=https://datasheet.ciiva.com/17212/aoa0000ce2-17212102.pdf?src-supplier=Avnet+Europe, ComponentLink4Description=https://datasheet.ciiva.com/43467/1678782-43467402.pdf?src-supplier=Farnell, ComponentLink4URL=https://datasheet.ciiva.com/43467/1678782-43467402.pdf?src-supplier=Farnell, ComponentLink5Description=https://datasheet.ciiva.com/9194/aoa0000ce2-9194142.pdf?src-supplier=Avnet, ComponentLink5URL=https://datasheet.ciiva.com/9194/aoa0000ce2-9194142.pdf?src-supplier=Avnet, ComponentLink6Description=https://datasheet.ciiva.com/16786/70260748-16786734.pdf?src-supplier=Allied+Electronics, ComponentLink6URL=https://datasheet.ciiva.com/16786/70260748-16786734.pdf?src-supplier=Allied+Electronics, ComponentLink7Description=https://datasheet.ciiva.com/24023/aoa0000ce2-24023017.pdf?src-supplier=Mouser, ComponentLink7URL=https://datasheet.ciiva.com/24023/aoa0000ce2-24023017.pdf?src-supplier=Mouser, ComponentLink8Description=https://datasheet.ciiva.com/28514/1678782-28514185.pdf?src-supplier=Element14, ComponentLink8URL=https://datasheet.ciiva.com/28514/1678782-28514185.pdf?src-supplier=Element14, ComponentLink9Description=https://datasheet.ciiva.com/27055/1987020-27055643.pdf?src-supplier=Jameco, ComponentLink9URL=https://datasheet.ciiva.com/27055/1987020-27055643.pdf?src-supplier=Jameco, ComponentLink10Description=https://datasheet.ciiva.com/48531/aoa0000ce2-48531069.pdf?src-supplier=Avnet, ComponentLink10URL=https://datasheet.ciiva.com/48531/aoa0000ce2-48531069.pdf?src-supplier=Avnet, ComponentLink11Description=https://datasheet.ciiva.com/16782/70260748-16782590.pdf?src-supplier=Allied+Electronics, ComponentLink11URL=https://datasheet.ciiva.com/16782/70260748-16782590.pdf?src-supplier=Allied+Electronics, ComponentLink12Description=https://datasheet.ciiva.com/30201/aoa0000ce2-30201022.pdf?src-supplier=Onlinecomponents.com, ComponentLink12URL=https://datasheet.ciiva.com/30201/aoa0000ce2-30201022.pdf?src-supplier=Onlinecomponents.com, Composition="Thick Film", Contact Plating=Tin, Depth=0.5mm, Features="Automotive AEC-Q200", Height=0.35mm, Lead Free="Lead Free", Length=1mm, Military Standard=Not, Mount="Surface Mount", Number of Pins=2, Number of Terminations=2, Packaging="Tape and Reel", Power Rating=100mW, Pricing 1="1 = 0,10000, 10 = 0,04300, 100 = 0,01750, 1000 = 0,00787, 2500 = 0,00683, 5000 = 0,00564 (USD)", Radiation Hardening=No, REACH SVHC="No SVHC", Resistance=10kR, RoHS=Yes, Stock 1=7512515, Supplier 1=Digi-Key, Termination=SMD/SMT, Voltage Rating (DC)=50V, Width=0.02inch
R140: library part Resistor, "RES SMD 2.2 OHM 5% 1/16W 0402", Case Code (Imperial)=0402, Case Code (Metric)=1005, Manufacturer=Yageo, Manufacturer Part Number=RC0402JR-072R2L, Max Operating Temperature=155°C, Max Power Dissipation=63mW, Min Operating Temperature=-55°C, Package Quantity=1, Power Rating=62.5mW, Supplier Part Number 1=311-2.2JRCT-ND, Temperature Coefficient=200ppm/°C, Tolerance=5%, Voltage Rating=50V, Case/Package=0402, Category="Chip SMD Resistors", ComponentLink1Description=https://datasheet.ciiva.com/2452/pyu-r-int-thick-7-2452737.pdf?src-supplier=Digi-Key, ComponentLink1URL=https://datasheet.ciiva.com/2452/pyu-r-int-thick-7-2452737.pdf?src-supplier=Digi-Key, ComponentLink2Description=https://datasheet.ciiva.com/2452/pyu-r-int-thick-7-2452738.pdf?src-supplier=Digi-Key, ComponentLink2URL=https://datasheet.ciiva.com/2452/pyu-r-int-thick-7-2452738.pdf?src-supplier=Digi-Key, ComponentLink3Description=https://datasheet.ciiva.com/2452/pyu-r-int-thick-7-2452739.pdf?src-supplier=Digi-Key, ComponentLink3URL=https://datasheet.ciiva.com/2452/pyu-r-int-thick-7-2452739.pdf?src-supplier=Digi-Key, ComponentLink4Description=https://datasheet.ciiva.com/28639/1018594-28639893.pdf?src-supplier=Element14, ComponentLink4URL=https://datasheet.ciiva.com/28639/1018594-28639893.pdf?src-supplier=Element14, ComponentLink5Description=https://datasheet.ciiva.com/28415/pyu-rc0402-51-rohs-l-6-28415222.pdf?src-supplier=Avnet+Europe, ComponentLink5URL=https://datasheet.ciiva.com/28415/pyu-rc0402-51-rohs-l-6-28415222.pdf?src-supplier=Avnet+Europe, ComponentLink6Description=https://datasheet.ciiva.com/16863/pyu-rc0402-51-rohs-l-6-16863111.pdf?src-supplier=Avnet+Europe, ComponentLink6URL=https://datasheet.ciiva.com/16863/pyu-rc0402-51-rohs-l-6-16863111.pdf?src-supplier=Avnet+Europe, ComponentLink7Description=https://datasheet.ciiva.com/8894/pyu-rc0402-51-rohs-l-6-8894569.pdf?src-supplier=Avnet, ComponentLink7URL=https://datasheet.ciiva.com/8894/pyu-rc0402-51-rohs-l-6-8894569.pdf?src-supplier=Avnet, ComponentLink8Description=https://datasheet.ciiva.com/15189/getdatasheetpartid-470524-15189562.pdf?src-supplier=Verical, ComponentLink8URL=https://datasheet.ciiva.com/15189/getdatasheetpartid-470524-15189562.pdf?src-supplier=Verical, ComponentLink9Description=https://datasheet.ciiva.com/12557/pyu-rc0402-51-rohs-l-6-r-8721-12557918.pdf?src-supplier=Mouser, ComponentLink9URL=https://datasheet.ciiva.com/12557/pyu-rc0402-51-rohs-l-6-r-8721-12557918.pdf?src-supplier=Mouser, Composition="Thick Film", Contact Plating=Tin,Matte,Lead, Depth=0.5mm, Features="Moisture Resistant", Height=0.016inch, Lead Free="Lead Free", Length=1mm, Military Standard=Not, Number of Pins=2, Number of Terminations=2, Packaging="Tape and Reel", Pricing 1="1=0,10000, 10=0,01900, 100=0,00760, 1000=0,00342, 2500=0,00297, 5000=0,00245 (USD)", Radiation Hardening=No, REACH SVHC="No SVHC", Resistance=2.2R, RoHS=Yes, Stock 1=928927, Supplier 1=Digi-Key, Termination=SMD/SMT, Voltage Rating (DC)=50V, Width=0.02inch, Working Voltage=50V
R149: library part Resistor, "Thick Film Resistors - SMD 196K OHM 1%", Case/Package=0402, Case Code (Metric)=1005, Manufacturer=Yageo, Manufacturer Part Number=RC0402FR-07196KL, Max Operating Temperature=155°C, Max Power Dissipation=63mW, Min Operating Temperature=-55°C, Power Rating=62.5mW, Supplier Part Number 1=YAG3024CT-ND, Temperature Coefficient=100ppm/°C, Tolerance=1%, Voltage Rating=50V, Case Code (Imperial)=0402, Category="Chip SMD Resistors", ComponentLink1Description=https://datasheet.ciiva.com/28419/pyu-rc0402-51-rohs-l-6-28419942.pdf?src-supplier=Avnet+Europe, ComponentLink1URL=https://datasheet.ciiva.com/28419/pyu-rc0402-51-rohs-l-6-28419942.pdf?src-supplier=Avnet+Europe, ComponentLink2Description=https://datasheet.ciiva.com/16869/pyu-rc0402-51-rohs-l-6-16869399.pdf?src-supplier=Avnet+Europe, ComponentLink2URL=https://datasheet.ciiva.com/16869/pyu-rc0402-51-rohs-l-6-16869399.pdf?src-supplier=Avnet+Europe, Composition="Thick Film", Contact Plating=Tin,Lead, Depth=0.5mm, Features="Moisture Resistant", Height=0.016inch, Lead Free="Lead Free", Length=1mm, Military Standard=Not, Number of Terminations=2, Packaging="Tape and Reel", Pricing 1="1=0,10000, 10=0,01600, 100=0,00640, 1000=0,00289, 2500=0,00251, 5000=0,00207 (USD)", Radiation Hardening=No, Resistance=196kR, RoHS=Yes, Stock 1=126965, Supplier 1=Digi-Key, Termination=SMD/SMT, Width=0.5mm
R150: library part Resistor, "TE CONNECTIVITY - CRGCQ0402F22K - RES, 22K, 1%, 0402, THICK FILM", Manufacturer="TE Connectivity", Manufacturer Part Number=CRGCQ0402F22K, Supplier Part Number 1=A129643CT-ND, ComponentLink1Description=http://www.farnell.com/datasheets/2609223.pdf?src-supplier=Farnell, ComponentLink1URL=http://www.farnell.com/datasheets/2609223.pdf?src-supplier=Farnell, Pricing 1="1=0,10000, 10=0,02100, 100=0,00860, 1000=0,00387, 2500=0,00336, 5000=0,00277 (USD)", RoHS=No, Stock 1=153295, Supplier 1=Digi-Key
R159 R737 R746 R747 R748 R749 R750 R751 R752 R753 R754 R755 R756 R757 R1002 R1003: library part Resistor, "Surface Mount Thick Film Resistor, Rc Series, 10 Kohm, 62.5 Mw, - 1%, 50 V, 0402 [1005 Metric]", Case/Package=0402, Case Code (Metric)=1005, Manufacturer=Yageo, Manufacturer Part Number=RC0402FR-0710KL, Max Operating Temperature=155°C, Min Operating Temperature=-55°C, Power Rating=62.5mW, Supplier Part Number 1=311-10.0KLRDKR-ND, Temperature Coefficient=100ppm/°C, Tolerance=1%, Voltage Rating=50V, Case Code (Imperial)=0402, Category="Chip SMD Resistors", ComponentLink1Description=https://datasheet.ciiva.com/7660/38568-7660787.pdf?src-supplier=Element14, ComponentLink1URL=https://datasheet.ciiva.com/7660/38568-7660787.pdf?src-supplier=Element14, ComponentLink2Description=https://datasheet.ciiva.com/7849/1784430-7849813.pdf?src-supplier=Element14, ComponentLink2URL=https://datasheet.ciiva.com/7849/1784430-7849813.pdf?src-supplier=Element14, ComponentLink3Description=https://datasheet.ciiva.com/7849/1686128-7849814.pdf?src-supplier=Element14, ComponentLink3URL=https://datasheet.ciiva.com/7849/1686128-7849814.pdf?src-supplier=Element14, ComponentLink4Description=https://datasheet.ciiva.com/7849/1784430-7849815.pdf?src-supplier=Element14, ComponentLink4URL=https://datasheet.ciiva.com/7849/1784430-7849815.pdf?src-supplier=Element14, ComponentLink5Description=https://datasheet.ciiva.com/22747/1018594-22747512.pdf?src-supplier=Element14, ComponentLink5URL=https://datasheet.ciiva.com/22747/1018594-22747512.pdf?src-supplier=Element14, ComponentLink6Description=https://datasheet.ciiva.com/12667/pyu-rc0402-51-rohs-l-6-r-12667067.pdf?src-supplier=Mouser, ComponentLink6URL=https://datasheet.ciiva.com/12667/pyu-rc0402-51-rohs-l-6-r-12667067.pdf?src-supplier=Mouser, ComponentLink7Description=https://datasheet.ciiva.com/7983/1018594-7983486.pdf?src-supplier=Element14, ComponentLink7URL=https://datasheet.ciiva.com/7983/1018594-7983486.pdf?src-supplier=Element14, Composition="Thick Film", Depth=0.5mm, Height=0.32mm, Lead Free="Lead Free", Lead Pitch=0.2mm, Length=1mm, Military Standard=Not, Number of Pins=2, Number of Terminations=2, Packaging="Tape and Reel", Pricing 1="1=0,10000, 10=0,01600, 100=0,00640, 1000=0,00289, 2500=0,00251, 5000=0,00207 (USD)", REACH SVHC="No SVHC", Resistance=10kR, RoHS=Yes, Stock 1=50506721, Supplier 1=Digi-Key, Termination=SMD/SMT, Voltage Rating (DC)=50V, Width=0.5mm, Working Voltage=50V
R160: library part Resistor, "RES SMD 910 OHM 5% 1/10W 0402", Case Code (Imperial)=0402, Case Code (Metric)=1005, Manufacturer=Panasonic, Manufacturer Part Number=ERJ2GEJ911X, Max Operating Temperature=155°C, Max Power Dissipation=100mW, Min Operating Temperature=-55°C, Package Quantity=1, Supplier Part Number 1=P910JCT-ND, Temperature Coefficient=200ppm/°C, Tolerance=5%, Voltage Rating=50V, Case/Package=0402, Category="Chip SMD Resistors", ComponentLink1Description=https://datasheet.ciiva.com/11821/0900766b80f806dd-11821385.pdf?src-supplier=RSComponents, ComponentLink1URL=https://datasheet.ciiva.com/11821/0900766b80f806dd-11821385.pdf?src-supplier=RSComponents, ComponentLink2Description=https://datasheet.ciiva.com/9119/aoa0000ce1-9119175.pdf?src-supplier=Avnet, ComponentLink2URL=https://datasheet.ciiva.com/9119/aoa0000ce1-9119175.pdf?src-supplier=Avnet, ComponentLink3Description=https://datasheet.ciiva.com/24071/aoa0000ce1-37422-24071816.pdf?src-supplier=Mouser, ComponentLink3URL=https://datasheet.ciiva.com/24071/aoa0000ce1-37422-24071816.pdf?src-supplier=Mouser, ComponentLink4Description=https://datasheet.ciiva.com/30072/4aoa0000ce1-30072265.pdf?src-supplier=Onlinecomponents.com, ComponentLink4URL=https://datasheet.ciiva.com/30072/4aoa0000ce1-30072265.pdf?src-supplier=Onlinecomponents.com, ComponentLink5Description=https://datasheet.ciiva.com/46379/1678796-46379916.pdf?src-supplier=Element14, ComponentLink5URL=https://datasheet.ciiva.com/46379/1678796-46379916.pdf?src-supplier=Element14, ComponentLink6Description=https://datasheet.ciiva.com/43470/1678796-43470111.pdf?src-supplier=Farnell, ComponentLink6URL=https://datasheet.ciiva.com/43470/1678796-43470111.pdf?src-supplier=Farnell, Composition="Thick Film", Contact Plating=Tin, Depth=0.5mm, Height=0.35mm, Lead Free="Contains Lead", Length=1mm, Military Standard=Not, Mount="Surface Mount", Number of Terminations=2, Packaging="Tape and Reel", Power Rating=100mW, Pricing 1="1=0,10000, 10=0,02700, 100=0,01100, 1000=0,00496, 2500=0,00430, 5000=0,00355 (USD)", Radiation Hardening=No, REACH SVHC="No SVHC", Resistance=910R, RoHS=Yes, Stock 1=129458, Supplier 1=Digi-Key, Termination=SMD/SMT, Voltage Rating (DC)=50V, Width=0.02inch
R165 R166 R167 R168 R169 R170 R171 R172: library part Resistor, "RES SMD 100 OHM 1% 1/16W 0402", Case Code (Imperial)=0402, Case Code (Metric)=1005, Manufacturer=Yageo, Manufacturer Part Number=RC0402FR-07100RL, Max Operating Temperature=155°C, Min Operating Temperature=-55°C, Power Rating=62.5mW, Supplier Part Number 1=311-100LRDKR-ND, Temperature Coefficient=100ppm/°C, Tolerance=1%, Voltage Rating=50V, Case/Package=0402, Category="Chip SMD Resistors", ComponentLink1Description=https://datasheet.ciiva.com/7849/1784430-7849810.pdf?src-supplier=Element14, ComponentLink1URL=https://datasheet.ciiva.com/7849/1784430-7849810.pdf?src-supplier=Element14, ComponentLink2Description=https://datasheet.ciiva.com/11808/0900766b80c66297-11808765.pdf?src-supplier=RSComponents, ComponentLink2URL=https://datasheet.ciiva.com/11808/0900766b80c66297-11808765.pdf?src-supplier=RSComponents, ComponentLink3Description=https://datasheet.ciiva.com/12667/pyu-rc0402-51-rohs-l-6-r-12667957.pdf?src-supplier=Mouser, ComponentLink3URL=https://datasheet.ciiva.com/12667/pyu-rc0402-51-rohs-l-6-r-12667957.pdf?src-supplier=Mouser, ComponentLink4Description=https://datasheet.ciiva.com/16740/pyu-rc0402-51-rohs-l-6-r-16740566.pdf?src-supplier=Future+Electronics, ComponentLink4URL=https://datasheet.ciiva.com/16740/pyu-rc0402-51-rohs-l-6-r-16740566.pdf?src-supplier=Future+Electronics, ComponentLink5Description=https://datasheet.ciiva.com/15189/getdatasheetpartid-329466-15189335.pdf?src-supplier=Verical, ComponentLink5URL=https://datasheet.ciiva.com/15189/getdatasheetpartid-329466-15189335.pdf?src-supplier=Verical, ComponentLink6Description=https://datasheet.ciiva.com/28367/1018594-28367226.pdf?src-supplier=Element14, ComponentLink6URL=https://datasheet.ciiva.com/28367/1018594-28367226.pdf?src-supplier=Element14, ComponentLink7Description=https://datasheet.ciiva.com/22747/1018594-22747511.pdf?src-supplier=Element14, ComponentLink7URL=https://datasheet.ciiva.com/22747/1018594-22747511.pdf?src-supplier=Element14, Composition="Thick Film", Depth=0.5mm, Height=0.32mm, Lead Free="Lead Free", Length=1mm, Military Standard=Not, Number of Pins=2, Packaging="Tape and Reel", Pricing 1="1=0,10000, 10=0,01600, 100=0,00640, 1000=0,00289, 2500=0,00251, 5000=0,00207 (USD)", REACH SVHC="No SVHC", Resistance=100R, RoHS=Yes, Stock 1=42078262, Supplier 1=Digi-Key, Termination=SMD/SMT, Voltage Rating (DC)=50V, Width=0.5mm
R173: library part Resistor, "RES SMD 500 OHM 0.1% 1/20W 0402", Case/Package=0402, Case Code (Metric)=1005, Manufacturer="Vishay Dale", Manufacturer Part Number=PNM0402E5000BST1, Max Operating Temperature=155°C, Max Power Dissipation=50mW, Min Operating Temperature=-55°C, Package Quantity=1000, Supplier Part Number 1=541-1905-1-ND, Temperature Coefficient=25ppm/°C, Tolerance=0.1%, Case Code (Imperial)=0402, Category="Chip SMD Resistors", ComponentLink1Description=https://datasheet.ciiva.com/29717/pnm-29717420.pdf?src-supplier=Digi-Key, ComponentLink1URL=https://datasheet.ciiva.com/29717/pnm-29717420.pdf?src-supplier=Digi-Key, ComponentLink2Description=https://datasheet.ciiva.com/29717/pnm-29717419.pdf?src-supplier=Digi-Key, ComponentLink2URL=https://datasheet.ciiva.com/29717/pnm-29717419.pdf?src-supplier=Digi-Key, ComponentLink3Description=https://datasheet.ciiva.com/29717/pnm-29717421.pdf?src-supplier=Digi-Key, ComponentLink3URL=https://datasheet.ciiva.com/29717/pnm-29717421.pdf?src-supplier=Digi-Key, Composition="Thin Film", Features="Moisture Resistant,Anti-Sulfur", Height=0.033inch, Lead Free="Lead Free", Length=0.042inch, Number of Terminations=2, Packaging="Tape and Reel", Pricing 1="1=1,08000, 10=0,95500, 100=0,69300 (USD)", Resistance=500R, RoHS=Yes, Stock 1=28724, Supplier 1=Digi-Key, Width=0.022inch
R212: library part Resistor, "SMT Resistor", Supplier Part Number 1=RR05P12.4KDCT-ND, Supplier 1=Digi-Key
R216: library part Resistor, Case/Package=0402, Manufacturer="Vishay Dale", Manufacturer Part Number=TNPW040231K2BEED, Max Operating Temperature=125°C, Max Power Dissipation=63mW, Min Operating Temperature=-55°C, Supplier Part Number 1=541-3564-1-ND, Temperature Coefficient=25ppm/°C, Tolerance=0.1%, ComponentLink1Description=https://datasheet.ciiva.com/9018/tnpw-e3-9018042.pdf?src-supplier=Avnet, ComponentLink1URL=https://datasheet.ciiva.com/9018/tnpw-e3-9018042.pdf?src-supplier=Avnet, Composition="Thin Film", Contact Plating=Tin, Features="Moisture Resistant,Automotive AEC-Q200,Anti-Sulfur", Height=0.016inch, Length=0.039inch, Number of Terminations=2, Packaging="Tape and Reel", Pricing 1="1 = 0,62000, 10 = 0,44000, 100 = 0,22880, 1000 = 0,12320, 2500 = 0,11968 (USD)", Radiation Hardening=No, Resistance=31.2kR, RoHS=Yes, Stock 1=4196, Supplier 1=Digi-Key, Width=0.02inch